# Altium PCB SOM_PCB_BLUETECHNIX.PcbDoc (part 2 of 8)
Units mil, origin at the board's own origin, x right, y up, seen from the top; angles counter-clockwise.
Board outline 1225 x 1620 mil, 8 copper layers (Top Layer, Int1 (Sign), Int2 (GND), Int3 (Sign), Int4 (Sign), Int5 (PWR), Int6 (Sign), Bottom Layer), stack 66.2 mil thick; 65 components, 201 nets, 938 pads, 497 vias.
Unrouted connection lines stored in the file: 25.
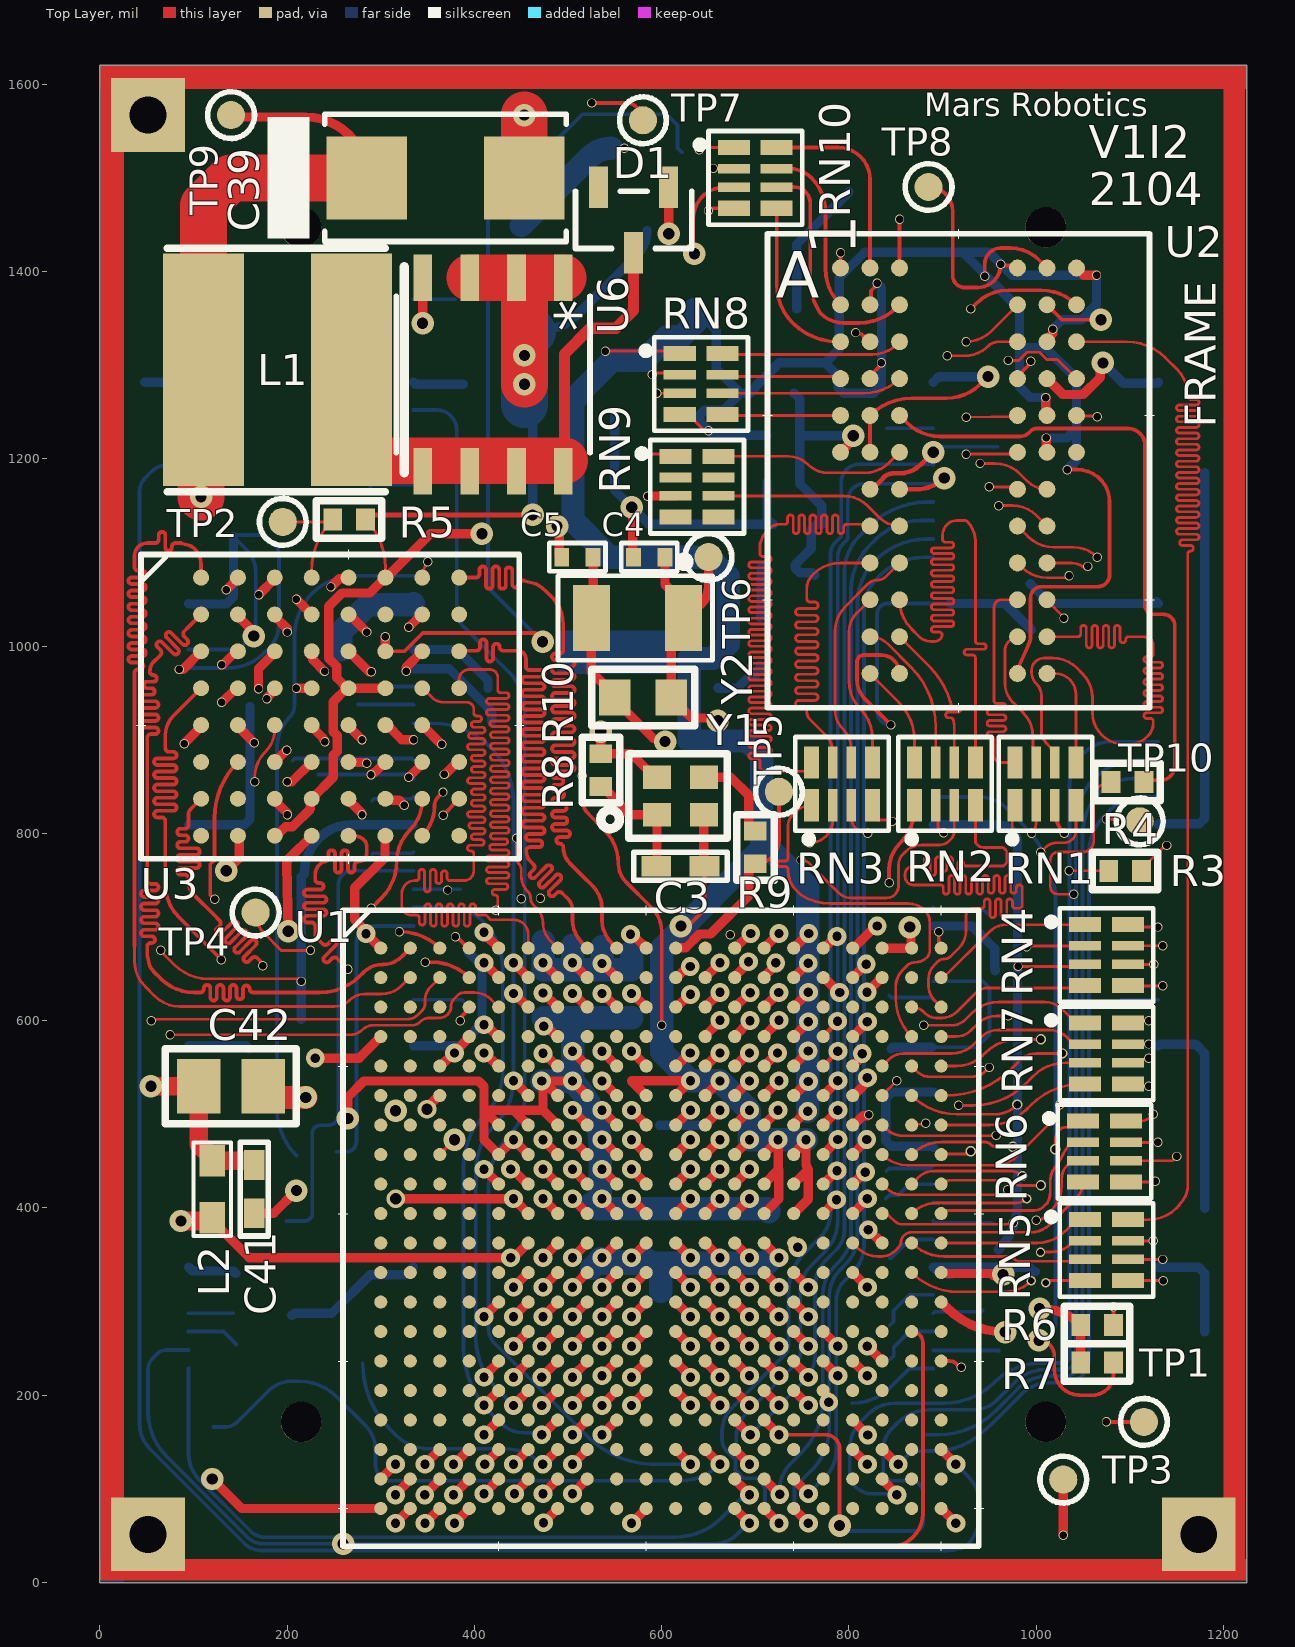
[diagram p0: Top Layer view]

## Part data (continued)
U6: library part FDS9926A, "Trans MOSFET P-CH 20V 3.5A 8-Pin SOIC N T/R", Case/Package=SOIC, Continuous Drain Current (ID)=3.5A, Current Rating=-3.5A, Drain to Source Breakdown Voltage=-20V, Drain to Source Resistance=130mR, Drain to Source Voltage (Vdss)=20V, Gate to Source Voltage (Vgs)=8V, Input Capacitance=405pF, Manufacturer="ON Semiconductor / Fairchild", Max Operating Temperature=175°C, Max Power Dissipation=2.5W, Min Operating Temperature=-55°C, Package Quantity=2500, Threshold Voltage=-600mV, Category=MOSFETs, ComponentLink1Description=https://datasheet.ciiva.com/1256/fds9431a-1256128.pdf?src-supplier=Newark, ComponentLink1URL=https://datasheet.ciiva.com/1256/fds9431a-1256128.pdf?src-supplier=Newark, ComponentLink2Description=https://datasheet.ciiva.com/15137/getdatasheetpartid-70130-15137336.pdf?src-supplier=Verical, ComponentLink2URL=https://datasheet.ciiva.com/15137/getdatasheetpartid-70130-15137336.pdf?src-supplier=Verical, ComponentLink3Description=https://datasheet.ciiva.com/4441/fds9431a-111226-4441596.pdf?src-supplier=Mouser, ComponentLink3URL=https://datasheet.ciiva.com/4441/fds9431a-111226-4441596.pdf?src-supplier=Mouser, ComponentLink4Description=https://datasheet.ciiva.com/932/fds9431a-932295.pdf?src-supplier=Digi-Key, ComponentLink4URL=https://datasheet.ciiva.com/932/fds9431a-932295.pdf?src-supplier=Digi-Key, ComponentLink5Description=https://datasheet.ciiva.com/932/fds9431a-932296.pdf?src-supplier=Digi-Key, ComponentLink5URL=https://datasheet.ciiva.com/932/fds9431a-932296.pdf?src-supplier=Digi-Key, ComponentLink6Description=https://datasheet.ciiva.com/8114/fds9431a-8114667.pdf?src-supplier=Avnet, ComponentLink6URL=https://datasheet.ciiva.com/8114/fds9431a-8114667.pdf?src-supplier=Avnet, ComponentLink7Description=https://datasheet.ciiva.com/932/fds9431a-932294.pdf?src-supplier=Digi-Key, ComponentLink7URL=https://datasheet.ciiva.com/932/fds9431a-932294.pdf?src-supplier=Digi-Key, ComponentLink8Description=https://datasheet.ciiva.com/26141/fds9431a-26141927.pdf?src-supplier=Avnet+Europe, ComponentLink8URL=https://datasheet.ciiva.com/26141/fds9431a-26141927.pdf?src-supplier=Avnet+Europe, ComponentLink9Description=https://datasheet.ciiva.com/8114/fds9431a-8114671.pdf?src-supplier=Avnet, ComponentLink9URL=https://datasheet.ciiva.com/8114/fds9431a-8114671.pdf?src-supplier=Avnet, Contact Plating=Tin,Matte, Dual Supply Voltage=-20V, Element Configuration=Single, Fall Time=21ns, Height=1.5mm, Lead Free="Lead Free", Length=5mm, Manufacturer Part Number=FDS9431A, Mount="Surface Mount", Nominal Vgs=-600mV, Number of Elements=1, Number of Pins=8, On-State Resistance=130mR, Packaging="Tape and Reel", Power Dissipation=2.5W, Pricing 1="1=0.68000, 10=0.59800, 25=0.56160, 100=0.40750, 500=0.34046, 1000=0.28976 (USD)", Radiation Hardening=No, Rds On Max=130mR, REACH SVHC="No SVHC", Rise Time=20ns, RoHS=Yes, Stock 1=2709, Supplier 1=Digi-Key, Termination=SMD/SMT, Turn-Off Delay Time=31ns, Turn-On Delay Time=6.5ns, Voltage Rating (DC)=-20V, Weight=0.2304g, Width=4mm
Y1: library part QM2244LEV-25.0M, "25MHz XO (Standard) CMOS, TTL Oscillator 3.3V Enable/Disable 4-SMD, No Lead"
Y2: library part G83270022, "32.768kHz ±10ppm Crystal 12.5pF 70 kOhms 2-SMD, No Lead", Frequency Tolerance=±10ppm, Load Capacitance=12.5pF, Package="2-SMD, No Lead", Manufacturer Product Number=G83270022, MF="Diodes Inc."

## Via types
v1: diameter 20, hole 10, Top Layer to Int2 (GND), tented both sides, 68 vias
v2: diameter 10, hole 8, Top Layer to Int3 (Sign), tented both sides, 53 vias
v3: diameter 20, hole 10, Top Layer to Bottom Layer, tented both sides, 44 vias
v4: diameter 10, hole 8, Top Layer to Int1 (Sign), tented both sides, 41 vias
v5: diameter 20, hole 10, Top Layer to Int5 (PWR), tented both sides, 40 vias
v6: diameter 10, hole 8, Top Layer to Int4 (Sign), tented both sides, 33 vias
v7: diameter 20, hole 10, Top Layer to Int3 (Sign), tented both sides, 25 vias
v8: diameter 24, hole 12, Int6 (Sign) to Bottom Layer, tented both sides, 22 vias
v9: diameter 20, hole 10, Top Layer to Int4 (Sign), tented both sides, 19 vias
v10: diameter 24, hole 12, Int4 (Sign) to Bottom Layer, tented both sides, 17 vias
v11: diameter 24, hole 12, Int2 (GND) to Bottom Layer, tented both sides, 15 vias
v12: diameter 20, hole 10, Top Layer to Int1 (Sign), tented both sides, 13 vias
v13: diameter 24, hole 12, Top Layer to Int6 (Sign), tented both sides, 11 vias
v14: diameter 24, hole 12, Top Layer to Int4 (Sign), tented both sides, 10 vias
v15: diameter 24, hole 12, Top Layer to Int3 (Sign), tented both sides, 8 vias
v16: diameter 11, hole 8, Top Layer to Int1 (Sign), tented both sides, 8 vias
v17: diameter 10, hole 8, Top Layer to Bottom Layer, tented both sides, 7 vias
v18: diameter 20, hole 10, Top Layer to Int6 (Sign), tented both sides, 7 vias
v19: diameter 10, hole 8, Top Layer to Int6 (Sign), tented both sides, 6 vias
v20: diameter 10, hole 8, Int4 (Sign) to Bottom Layer, tented both sides, 6 vias
v21: diameter 24, hole 12, Int1 (Sign) to Bottom Layer, tented both sides, 5 vias
v22: diameter 24, hole 12, Top Layer to Int2 (GND), tented both sides, 5 vias
v23: diameter 10, hole 7, Top Layer to Int1 (Sign), tented both sides, 4 vias
v24: diameter 10, hole 8, Top Layer to Int2 (GND), tented both sides, 4 vias
v25: diameter 10, hole 8, Int2 (GND) to Bottom Layer, tented both sides, 4 vias
v26: diameter 24, hole 12, Int3 (Sign) to Bottom Layer, tented both sides, 4 vias
v27: diameter 24, hole 12, Top Layer to Bottom Layer, tented both sides, 4 vias
v28: diameter 10, hole 8, Int5 (PWR) to Bottom Layer, tented both sides, 3 vias
v29: diameter 20, hole 10, Int2 (GND) to Bottom Layer, tented both sides, 2 vias
v30: diameter 10, hole 8, Int6 (Sign) to Bottom Layer, tented both sides, 2 vias
v31: diameter 10, hole 8, Top Layer to Bottom Layer, 1 vias
v32: diameter 22, hole 12, Int2 (GND) to Bottom Layer, tented both sides, 1 vias
v33: diameter 24, hole 10, Int2 (GND) to Bottom Layer, tented both sides, 1 vias
v34: diameter 20, hole 12, Top Layer to Int5 (PWR), tented both sides, 1 vias
v35: diameter 20, hole 12, Top Layer to Int2 (GND), tented both sides, 1 vias
v36: diameter 24, hole 12, Top Layer to Int5 (PWR), tented both sides, 1 vias
v37: diameter 24, hole 12, Top Layer to Int1 (Sign), tented both sides, 1 vias

## Nets (pads, with @x,y where several pads share a name; then routed paths per layer and width w, separated by ;. In a path a pad name is that pad's centre, name@x,y a point inside that pad or via, vN(x,y) a via of type N, cw(c..) or ccw(c..) an arc to the next point about the centre after c; other vN are vias at no path point)
+2V5: C1.2 C6.1 R1.2 TP8.0 U1.F10 U1.F11 U1.F12 U1.G15 U1.H13 U1.H14 U1.H15 U1.J14 U1.J15 U1.K14 U1.K15 U2.A7 U2.A9 U2.B2 U2.C8 U2.D2 U2.E8 U2.F8 U2.M7 U5.3 | length 4194.7
  Top Layer w4: U2.D2@822.52,1285.63 822.52,1288.57 v17@834.71,1300.76 ; U2.B2@822.52,1364.37 823.5,1365.35 823.5,1379.37 830,1385.87 v17(830,1387.49) ; TP8.0@885,1490.24 cw(c885,1464.48) 910.76,1464.48 910.76,1395.91 ccw(c923.87,1395.91) 923.87,1382.79 937.17,1382.79 ccw(c937.17,1407.69) 962.07,1407.69 v17(962.07,1407.93) ; v17@964.45,1407.17 965.2,1406.42 977.32,1406.42 U2.A7@980,1403.74 ; U2.M7@980,970.67 980,975 991.77,1002.01 992.83,1004.43 ccw(c980,1010.04) 994,1010.04 994,1051.71 cw(c1005.7,1051.71) 994.19,1053.79 cw(c1005.7,1051.71) 1005.7,1063.41 1065.63,1063.41 ccw(c1065.63,1076.11) 1078.33,1076.11 1078.33,1153.96 ccw(c1043.85,1153.96) 1070.13,1176.29 ccw(c1043.85,1153.96) 1043.85,1188.45 v6(1032.95,1188.45)
  Top Layer w10: U1.F10@583.5,520 583.38,520 567.88,535.5 567.76,535.5 568,535.75 v3(630.75,535.75) U1.F11@615,520 ; U1.F12@646.5,520 646.62,520 662.12,535.5 v3(662.24,535.5) ; U1.H13@677.99,457.01 v3(693.74,472.76) ; U1.K14@709.49,394.02 725.24,409.76 724.96,410.04 724.96,440.9 724.69,441.17 ; U1.J14@709.49,425.51 724.69,441.17 ; U1.H14@709.49,457.01 v3(724.19,472.76) 724.44,472.5 724.44,441.42 724.69,441.17 ; U1.K15@740.98,394.02 741.3,394.02 756.28,409 ccw(c755.2,410.09) 756.73,410.09 756.73,441.26 ; U1.J15@740.98,425.51 756.73,441.26 ; U1.H15@740.98,457.01 740.98,458.09 751.04,468.15 v3(754.19,472.76) 754.19,447.41 ccw(c762.88,447.41) 756.73,441.26 ; U1.G15@740.98,488.5 740.98,489.53 751.53,500.08 v3(755.98,503.23) ; v20(1010.2,1265.41) 1010.2,1247.56 U2.E8@1011.5,1246.26 ; v6(1010.64,1222.26) 1010.64,1207.75 U2.F8@1011.5,1206.89 ; U2.C8@1011.5,1325 1010.2,1326.3 1017.62,1333.72 v17(1017.62,1338.33) ; U2.A9@1042.99,1403.74 1050.83,1395.91 v17(1064.37,1395.91)
  Int4 (Sign) w4: v17@834.71,1300.77 v17(834.71,1302.38) ; v17(962.07,1407.93) v17@964.45,1407.17
  Bottom Layer w10: C6.1@635.87,1360 658.43,1337.44 658.43,1295.73 684.16,1270 666.19,1252.04 645.89,1252.04 U5.3@640.55,1246.7 640.55,1240.2 655.75,1225 R1.2@712.48,1225 ; C1.2@689.24,1270 694.31,1270 700.16,1275.84 700.16,1277.28 725.26,1302.38 774.65,1302.38 ; v17(830,1387.49) 834.71,1382.79 v17(834.71,1302.38) 834.71,1278.12 826.59,1270 794.49,1270 788.63,1275.86 788.63,1288.4 774.65,1302.38 ; v20(1010.2,1265.41) 993.58,1265.41 982.12,1276.88 982.12,1318.43 ; v6(1010.64,1222.26) 1032.78,1222.26 1042.99,1232.47 ; v17(1017.62,1338.33) 1027.77,1348.48 1048.23,1348.48 1064.37,1364.62 v17(1064.37,1395.91) 974.09,1395.91 v17(962.07,1407.93) 949.53,1420.47 921.61,1420.47 ; v6(1032.95,1188.45) 1042.99,1198.49 1042.99,1232.47 ; 774.65,1302.38 789.65,1317.39 789.65,1393.37 816.75,1420.47 921.61,1420.47 ; 921.61,1420.47 982.12,1359.97 982.12,1318.43 ; 982.12,1318.43 1010.2,1318.43 1042.99,1285.63 1042.99,1232.47
  Bottom Layer w25: C6.1@635.87,1360 635.87,1345.24 620.81,1330.18 606.04,1330.18 581.22,1305.35 547.23,1305.35 508.71,1266.83 508.71,1264.73 505.31,1261.34 505.31,1134.09 544.41,1095 650,1095 671.09,1073.91 671.09,1002.43 655.36,986.69 629.63,986.69 629.63,898.61 692.13,898.61 706.9,883.84 706.9,791.78 ; v3(754.19,472.76) v3(724.19,472.76) v3(693.74,472.76) 693.74,504 v3(662.24,535.5) 662,535.75 v3(630.75,535.75) 600,566.5 600,677.06 706.9,783.96 706.9,791.78 ; v3(755.98,503.23) 755.98,742.7 706.9,791.78
  other v6: 1010.2,1265.41
  other v20: 1032.95,1188.45 1010.64,1222.26
+3V3: C7.1 C9.2 C10.2 C11.2 C12.2 C13.2 C20.2 C21.2 C22.2 C23.2 C24.2 FRAME.71 FRAME.117 FRAME.118 J1.3 R5.2 R6.2 R8.1 TP7.0 U1.E5 U1.E9 U1.E10 U1.E11 U1.E12 U1.F7 U1.F8 U1.F13 U1.F15 U1.G5 U1.G6 U1.G7 U1.G14 U1.H5 U1.H6 U1.K6 U1.M15 U1.N5 U1.N15 U1.P15 U1.R6 U1.R7 U1.R8 U1.R15 U1.T7 U1.T8 U1.T9 U1.T10 U1.T11 U1.T12 U1.T13 U1.T14 U1.T15 U1.T16 U3.A6 U3.D5 U3.D6 U3.G4 U3.H3 U5.1 U6.1 U6.2 U6.3 Y1.4 | length 3692
  Top Layer w3: R5.2@283.78,1135 cw(c232.55,1083.77) 305,1083.77 U3.A6@305,1073.11
  Top Layer w4: v17(525.25,1580) 561.48,1580 cw(c561.48,1561.48) TP7.0@580,1561.48 ; R6.2@1082.52,275 v6(1082.52,294.58)
  Top Layer w5: R5.2@283.78,1135 288.78,1140 v14(462.16,1140)
  Top Layer w10: U3.H3@186.89,797.52 188.78,797.52 198.26,807 205.76,807 224.92,826.16 224.92,835.55 U3.G4@226.26,836.89 249.13,859.76 249.13,883.09 253.45,887.41 253.45,904.48 249.13,908.8 249.13,940.39 263.74,955 U3.D6@305,955 ; U3.D5@264.1,955 252.99,966.11 252.99,978.35 244.37,986.97 244.37,1042.24 258.74,1056.61 288.27,1056.61 304.77,1073.11 U3.A6@305,1073.11 306.14,1073.11 353.03,1120 v13(408.11,1120) ; v36@264.75,498.27 264.75,518.19 282.06,535.5 404.42,535.5 410.28,529.64 410.28,504.25 ; v34(316.14,409.76) v5(441.77,409.76) U1.K6@457.52,394.02 ; v5(410.28,283.78) U1.N5@426.02,299.53 ; v3(410.28,565.5) 411.15,565.5 425.15,551.5 U1.E5@426.02,551.5 ; U1.G5@426.02,488.5 410.28,504.25 ; v5(441.77,219.34) 441.77,220.06 457.52,235.81 U1.R6@457.52,236.54 ; U1.H6@457.52,457.01 v5(441.77,472.76) U1.H5@426.02,457.01 410.28,472.76 410.28,504.25 ; U1.G6@457.52,488.5 441.77,504.25 ; v3(471.76,535.5) 473.27,533.99 473.27,504.25 ; v5(472.01,189.1) 472.54,189.1 488.48,205.04 U1.T7@489.02,205.04 ; v5(472.01,219.34) 472.01,219.44 489.02,236.44 U1.R7@489.02,236.54 ; U1.G7@489.02,488.5 473.27,504.25 ; U1.F7@489.02,520 488.89,520 473.39,535.5 v3(504.76,535.5) 504.89,535.5 520.39,520 U1.F8@520.51,520 ; v5(504.76,189.1) 504.76,189.2 520.51,204.94 U1.T8@520.51,205.04 ; v5(504.76,219.34) 504.76,220.06 520.51,235.81 U1.R8@520.51,236.54 ; v14@535,914.67 R8.1@535,885 567.5,885 592.5,860 Y1.4@595,860 ; v5(536.26,189.1) 536.26,189.2 552.01,204.94 U1.T9@552.01,205.04 ; v5(536.26,567.24) U1.E9@552.01,551.5 ; v5(567.76,189.1) 567.76,189.2 583.5,204.94 U1.T10@583.5,205.04 ; v5(567.76,567.24) U1.E10@583.5,551.5 ; U1.T11@615,205.04 v5(630.75,189.29) ; U1.E11@615,551.5 615.71,551.5 629.71,565.5 v5(630.41,565.5) ; U1.T12@646.5,205.04 v5(662.24,189.29) ; U1.E12@646.5,551.5 647.37,551.5 661.37,565.5 v5(662.24,565.5) ; U1.T13@677.99,205.04 v5(693.74,189.29) ; U1.F13@677.99,520 678.12,520 693.62,535.5 v5(693.74,535.5) ; U1.T14@709.49,205.04 v5(725.24,189.29) ; U1.G14@709.49,488.5 709.49,489.03 724.19,503.73 v5(724.19,504.25) ; U1.T15@740.98,205.04 v5(756.73,189.29) ; U1.R15@740.98,236.54 740.98,235.81 756.73,220.06 v5(756.73,219.34) ; U1.P15@740.98,268.03 v5(756.73,252.28) ; U1.N15@740.98,299.53 v5(756.73,283.78) ; U1.M15@740.98,331.02 v5(756.73,315.28) ; U1.F15@740.98,520 741.36,520 756.36,535 v5(756.73,535) ; U1.T16@772.48,205.04 772.48,203.96 776.52,199.92 776.52,194.55 v5(778.43,192.64) ; 410.28,504.25 441.77,504.25 ; 441.77,504.25 473.27,504.25
  Top Layer w50: U6.3@395,1393.25 U6.2@445,1393.25 ; v27(453.46,1279.7) v27(453.46,1310.35) 453.46,1384.79 U6.2@445,1393.25 ; U6.1@495,1393.25 U6.2@445,1393.25
  Int3 (Sign) w10: v5(410.28,283.78) ccw(c489.8,283.78) 433.57,227.54 v5(441.77,219.34)
  Bottom Layer w5: U5.1@459.45,1246.7 U5.1@462.16,1243.99
  Bottom Layer w10: FRAME.118@335,976.61 335.91,975.71 373.05,975.71 418.62,930.14 v28(418.62,920) ; FRAME.117@335,996.3 381.81,996.3 414.5,963.61 v28(414.5,954.75) ; v14(462.16,1140) U5.1@462.16,1243.99 ; C7.1@477.56,1339.12 ccw(c477.56,1381.5) 507.53,1351.53 573.37,1417.37 ccw(c546.96,1443.77) J1.3@584.3,1443.77 ; FRAME.71@890.12,701.02 931.48,701.02 955.7,676.81 955.7,656.94 v28(956.4,653.26)
  Bottom Layer w25: v3(471.76,535.5) v3(504.76,535.5) ; C13.2@473.74,602.85 cw(c474.68,601.9) 474.68,603.24 C11.2@505.07,603.24 ; C20.2@525.46,404.41 530.69,399.19 712.78,399.19 714.44,397.53 C24.2@714.44,395.76 ; C20.2@534.36,414.57 534.36,464.48 ccw(c434.36,464.48) 505.08,535.19 v3(504.76,535.5) ; C10.2@568.06,603.24 C12.2@536.57,603.24 C11.2@505.07,603.24 ; v3(504.76,535.5) 505.07,535.81 C11.2@505.07,603.24
  Bottom Layer w50: U5.1@453.46,1258.11 v27(453.46,1279.7) v27(453.46,1310.35) 453.46,1326.89 C7.1@462.16,1335.59
  other v10: 462.16,1140
  other v14: 535,908.57
  other v20: 1082.52,294.58 535,908.57
  other v36: 264.75,495.5